# Altium PCB slave.PcbDoc (part 7 of 7)
Units mil, origin at the board's own origin, x right, y up, seen from the top; angles counter-clockwise.
Board outline 6299.21 x 3937.01 mil, 6 copper layers (Top Copper, FUSED_VBAT-, Signal Layer 2, Signal Layer 3, VREG, Bot Copper), stack 65.355 mil thick; 495 components, 307 nets, 1435 pads, 1866 vias.
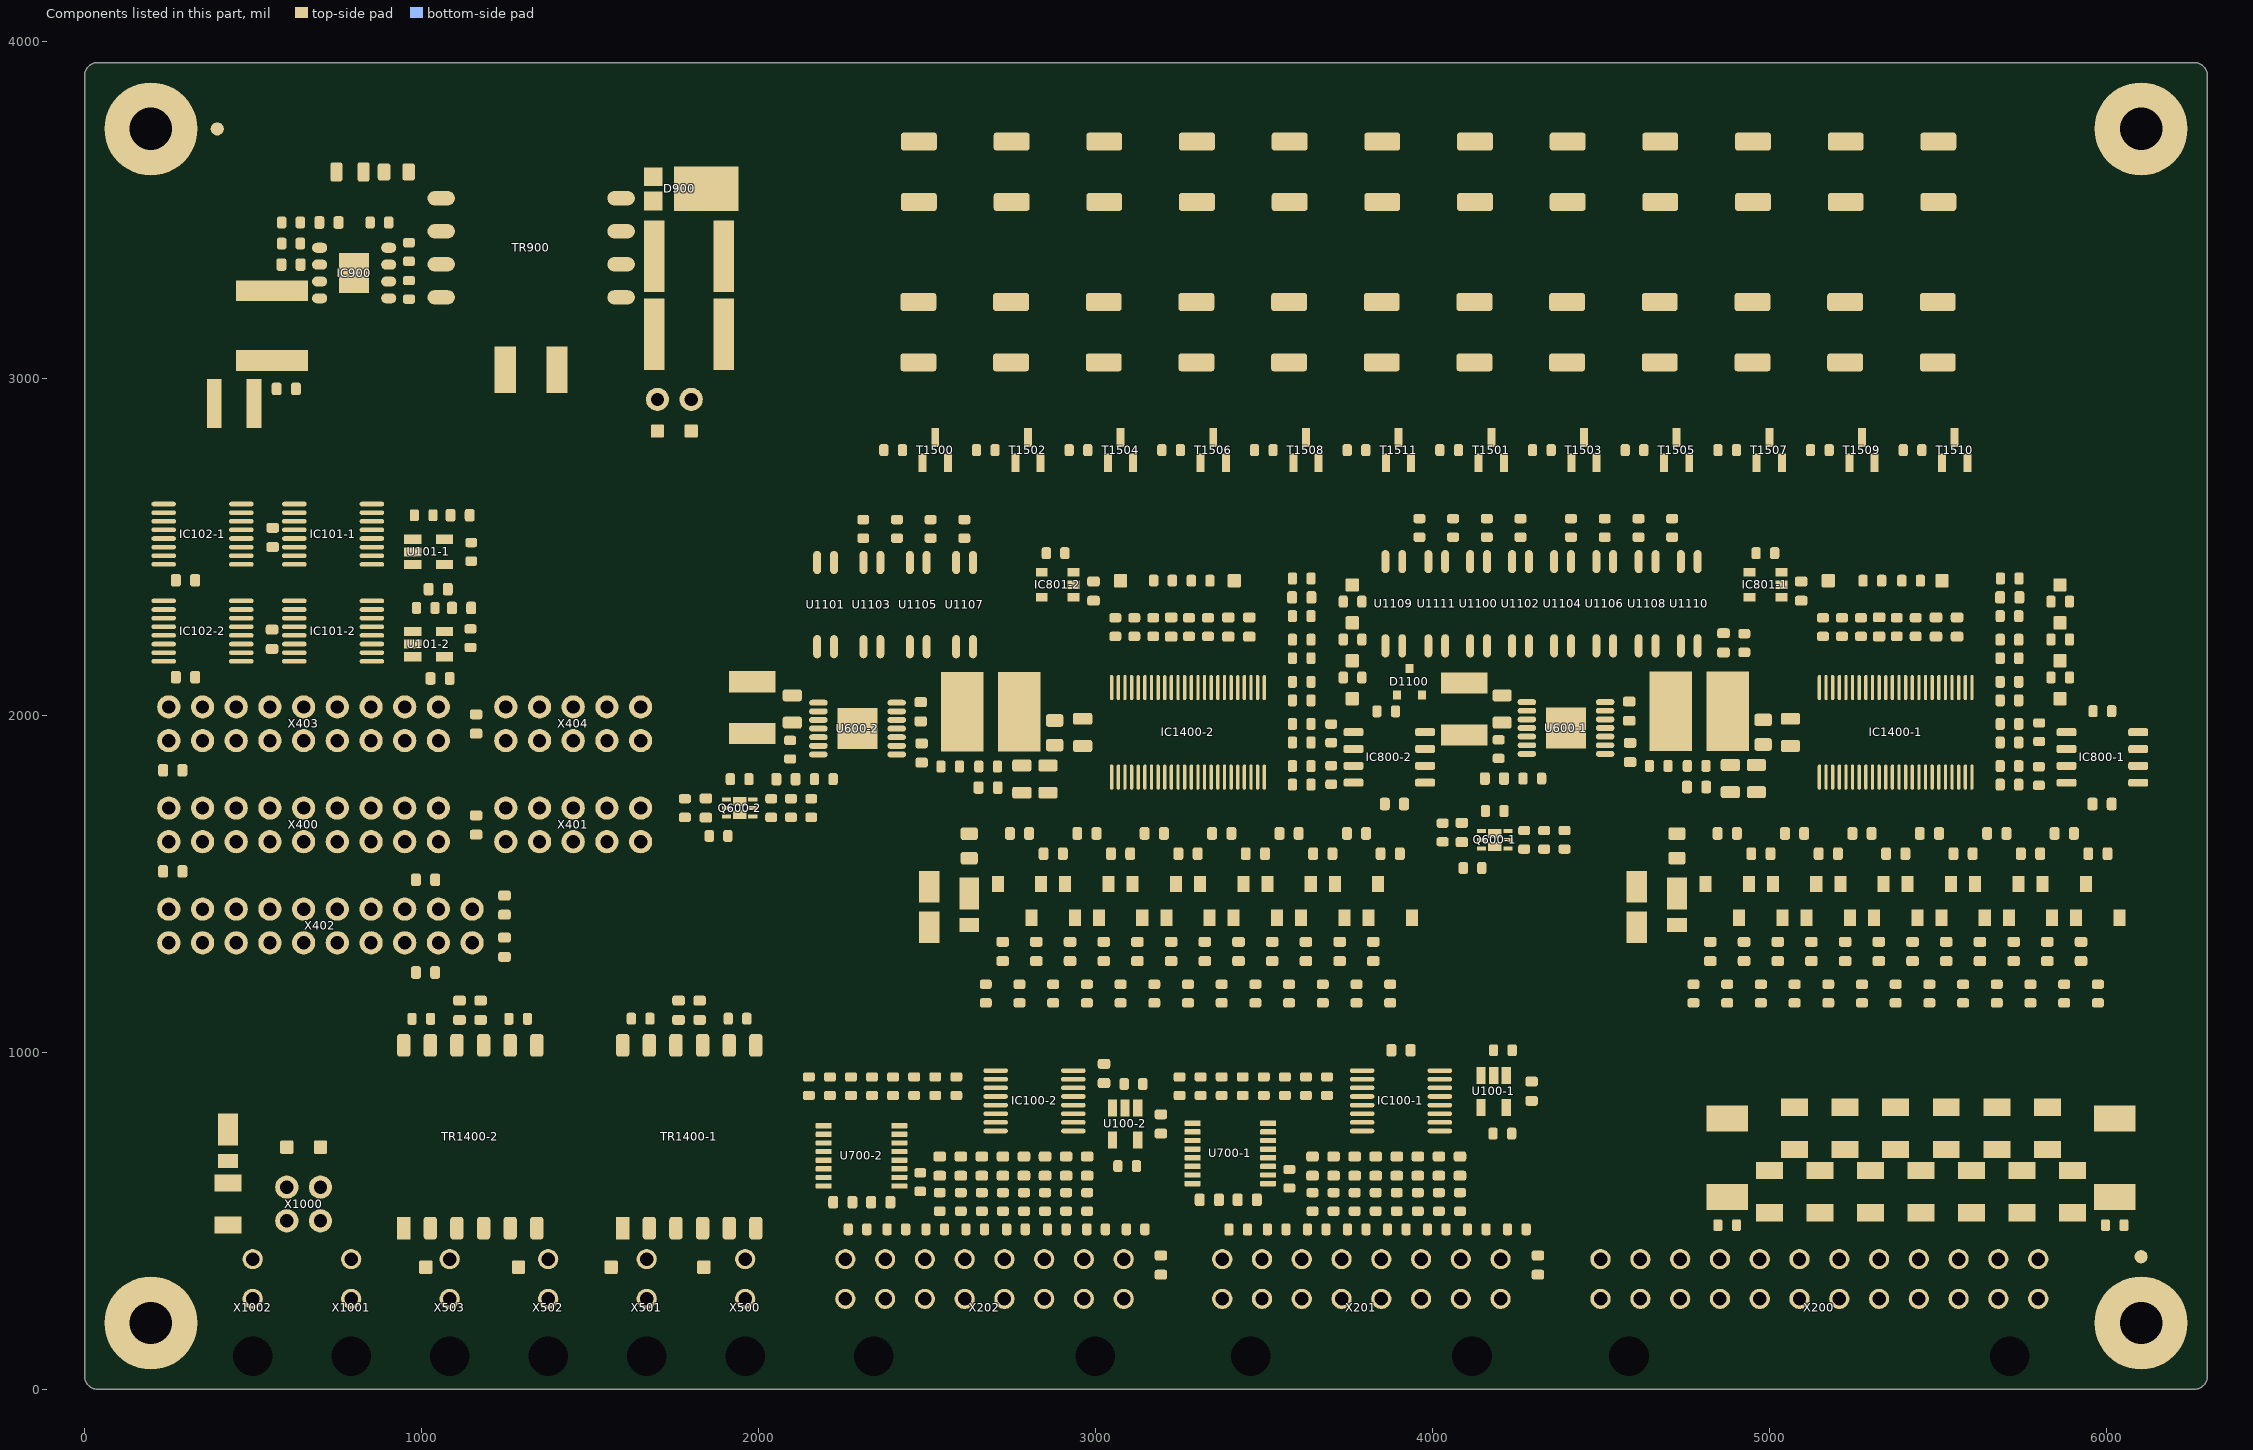
[diagram p10: the components of this part, seen from the top]

## Polygon pours and split planes (outlines as drawn) (continued)
no net on Bottom Overlay "Polygon_13_NoNet" (solid, pour order 20): 31 vertices, not listed, extent 5966.49,1962.62 6145.7,2214.94
no net on Bottom Overlay "Polygon_12_NoNet" (solid, pour order 11): 50 vertices, not listed, extent 5966.41,1985.18 6115.66,2215
no net on Bottom Overlay "Polygon_11_NoNet" (solid, pour order 26): 24 vertices, not listed, extent 5966.46,2051.8 6090.7,2214.92
+5.0V_VREG_0 on VREG "Polygon_1_Net_+5.0V_VREG_0" (solid, remove dead copper, pour order 130): 33 vertices, not listed, extent 196.21,-3 6302.21,2798.28
+5.0V_VREG_1 on VREG "Polygon_1_Net_+5.0V_VREG_1" (solid, remove dead copper, pour order 134): 34 vertices, not listed, extent 183.56,-3 3978,2540.5
VIN_1 on Top Copper "Top-EXT_DC_ISO+" (solid, pour order 394): 1893.65,1998.23 2206.15,1998.23 2206.15,1973.23 2131.15,1973.23 2131.15,1910.73 1893.65,1910.73
FUSED_VBAT- on Top Copper "Top-FUSED_VBAT-" (solid, pour order 388): 18 vertices, not listed, extent 1893.65,1698.23 2893.65,2135.73
FUSED_VBAT- on Top Copper "Top-FUSED_VBAT-" (solid, pour order 368): 18 vertices, not listed, extent 3995.98,1699.97 4995.98,2137.47
EXT_DC_IN- on Top Copper "Polygon_1_Net_EXT_DC_IN-" (solid, remove dead copper, pour order 336): 750,3262.5 750,3487.5 847.5,3487.5 847.5,3112.5 1287.5,3112.5 1287.5,2937.5 606.25,2937.5 606.25,3012.5 443.75,3012.5 443.75,3156.25 675,3156.25 675,3262.5
NetC904_1 on Top Copper "Polygon_1_Net_N$74" (solid, remove dead copper, pour order 332): 587.5,3000 587.5,2843.75 475,2843.75 475,3000
VIN_1 on Top Copper "Top-VIN_2" (solid, pour order 396): 1924.9,1760.7 1949.9,1760.7 1949.9,1839.58 2012.4,1839.58 2012.4,1735.7 1974.9,1735.7 1974.9,1723.2 1924.9,1723.2
VIN_0 on Top Copper "Top-EXT_DC_ISO+" (solid, pour order 366): 3995.98,1999.97 4308.48,1999.97 4308.48,1974.97 4233.48,1974.97 4233.48,1912.47 3995.98,1912.47
+5.0V_VREG_1 on Top Copper "Top-+5.0V_VREG_1" (solid, pour order 400): 2693.65,2135.73 2693.65,1760.73 2731.15,1760.73 2731.15,1885.73 2806.15,1885.73 2806.15,1960.73 2918.65,1960.73 2918.65,2135.73
LTC-V+_0 on Top Copper "Polygon_1_Net_N$17" (solid, remove dead copper, pour order 37): 4430,1622 4800,1622 4800,1692.67 4430,1692.67
+5.0V_VREG_0 on Top Copper "Top-+5.0V_VREG_1" (solid, pour order 360): 4795.98,2137.47 4795.98,1762.47 4833.48,1762.47 4833.48,1887.47 4908.48,1887.47 4908.48,1962.47 5020.98,1962.47 5020.98,2137.47
LTC-V+_1 on Top Copper "Polygon_1_Net_N$24" (solid, remove dead copper, pour order 36): 2231.15,1622 2704.33,1622 2704.33,1687.5 2231.15,1687.5
EXT_DC_ISO+ on Top Copper "Polygon_2_Net_EXT_DC_ISO+" (solid, remove dead copper, pour order 35): 4778,1603 4672,1603 4672,1440.75 4778,1440.75
EXT_DC_ISO+ on Top Copper "Top-EXT_DC_ISO+ 1" (solid, pour order 398): 1750,1773.2 1899.9,1773.2 1899.9,1837.5 1937.4,1837.5 1937.4,1773.2 1924.9,1773.2 1924.9,1735.7 1750,1735.7
SW_1 on Top Copper "Top-SW_2" (solid, pour order 392): 2381.15,2060.73 2531.15,2060.73 2531.15,2135.73 2643.65,2135.73 2643.65,1885.73 2531.15,1885.73 2531.15,2010.73 2443.65,2010.73 2443.65,1973.23 2381.15,1973.23
NetC607-2_2 on Top Copper "Top-NetC1505_2_2" (solid, pour order 390): 2768.65,1873.23 2818.65,1873.23 2818.65,1935.73 2918.65,1935.73 2918.65,1835.73 2768.65,1835.73
NetC607-1_2 on Top Copper "Top-NetC1505_2_2" (solid, pour order 372): 4850,1871.23 4918.75,1871.23 4918.75,1933.73 5018.75,1933.73 5018.75,1833.73 4850,1833.73
SW_0 on Top Copper "Top-SW_2" (solid, pour order 370): 4483.48,2062.47 4633.48,2062.47 4633.48,2137.47 4745.98,2137.47 4745.98,1887.47 4633.48,1887.47 4633.48,2012.47 4545.98,2012.47 4545.98,1974.97 4483.48,1974.97
VIN_0 on Top Copper "Top-VIN_2" (solid, pour order 364): 4162.96,1668.16 4187.36,1668.16 4187.36,1740.66 4246.86,1740.66 4246.86,1643.16 4209.36,1643.16 4209.36,1630.66 4162.96,1630.66
EXT_DC_ISO+ on Top Copper "Top-EXT_DC_ISO+ 1" (solid, pour order 362): 3993.75,1705.7 4134.36,1705.7 4134.36,1740.66 4181.11,1740.66 4181.11,1680.66 4159.36,1680.66 4159.36,1647.59 3993.75,1647.59
no net on Top Copper "Polygon_1_Net_N$92" (solid, remove dead copper, pour order 346): 800,3650 800,3575 912.5,3575 912.5,3650
EXT_DC_IN+ on Top Copper "Polygon_1_Net_EXT_DC_IN+" (solid, remove dead copper, pour order 133): 209.5,653 840.5,653 840.5,209.5 459.5,209.5 459.5,447 209.5,447
NetC902_2 on Top Copper "Polygon_1_Net_N$1254" (solid, remove dead copper, pour order 334): 19 vertices, not listed, extent 350,2843.75 1100,3650
NetC904_1 on Top Copper "Polygon_2_Net_N$91" (solid, remove dead copper, pour order 132): 209.5,722 840.5,722 840.5,865.5 209.5,865.5
NetD901_1 on Top Copper "Polygon_1_Net_N$89" (solid, remove dead copper, pour order 43): 209.5,572 540.5,572 540.5,715.5 209.5,715.5
NetTR900_6 on Top Copper "Polygon_1_Net_N$74" (solid, remove dead copper, pour order 348): 1637.5,3475 1637.5,3300 1537.5,3300 1537.5,3475
NetD900_2 on Top Copper "Polygon_1_Net_N$84" (solid, remove dead copper, pour order 344): 1712.5,3662.5 1712.5,3500 1537.5,3500 1537.5,3662.5
NetIC900_5 on Top Copper "Polygon_1_Net_N$80" (solid, remove dead copper, pour order 342): 1200,3187.5 1200,3650 937.5,3650 937.5,3575 1125,3575 1125,3375 1012.5,3375 1012.5,3262.5 875,3262.5 875,3187.5
EXT_DC_ISO+ on Top Copper "Polygon_1_Net_EXT_DC_ISO+" (solid, pour order 340): 1950,3662.5 1950,2875 1775,2875 1775,3500 1750,3500 1750,3662.5
FUSED_VBAT- on Top Copper "Polygon_2_Net_FUSED_VBAT-" (solid, pour order 338): 1725,3475 1725,2875 1362.5,2875 1362.5,3100 1537.5,3100 1537.5,3275 1662.5,3275 1662.5,3475
EXT_DC_ISO+ on Top Copper "Polygon_4_Net_EXT_DC_ISO+" (solid, remove dead copper, pour order 34): 2678,1603 2572,1603 2572,1440.75 2678,1440.75
FUSED_CELL_10+ on Top Copper "Polygon_1_Net_FUSED_CELL_10+" (solid, remove dead copper, pour order 114): 2346.21,3159.01 2346.21,3590.01 2602.21,3590.01 2602.21,3159.01
FUSED_CELL_9+ on Top Copper "Polygon_1_Net_FUSED_CELL_9+" (solid, remove dead copper, pour order 115): 2621.21,3159.01 2621.21,3590.01 2877.21,3590.01 2877.21,3159.01
FUSED_CELL_8+ on Top Copper "Polygon_1_Net_FUSED_CELL_8+" (solid, remove dead copper, pour order 117): 2896.21,3159.01 2896.21,3590.01 3152.21,3590.01 3152.21,3159.01
FUSED_CELL_7+ on Top Copper "Polygon_1_Net_FUSED_CELL_7+" (solid, remove dead copper, pour order 116): 3171.21,3159.01 3171.21,3590.01 3427.21,3590.01 3427.21,3159.01
FUSED_CELL_6+ on Top Copper "Polygon_1_Net_FUSED_CELL_6+" (solid, remove dead copper, pour order 113): 3446.21,3159.01 3446.21,3590.01 3702.21,3590.01 3702.21,3159.01
FUSED_CELL_5+ on Top Copper "Polygon_1_Net_FUSED_CELL_5+" (solid, remove dead copper, pour order 108): 3721.21,3159.01 3721.21,3590.01 3977.21,3590.01 3977.21,3159.01
FUSED_CELL_4+ on Top Copper "Polygon_1_Net_FUSED_CELL_4+" (solid, remove dead copper, pour order 107): 3996.21,3159.01 3996.21,3590.01 4252.21,3590.01 4252.21,3159.01
FUSED_CELL_3+ on Top Copper "Polygon_1_Net_FUSED_CELL_3+" (solid, remove dead copper, pour order 106): 4271.21,3159.01 4271.21,3590.01 4527.21,3590.01 4527.21,3159.01
FUSED_CELL_2+ on Top Copper "Polygon_1_Net_FUSED_CELL_2+" (solid, remove dead copper, pour order 109): 4546.21,3159.01 4546.21,3590.01 4802.21,3590.01 4802.21,3159.01
FUSED_CELL_1+ on Top Copper "Polygon_1_Net_FUSED_CELL_1+" (solid, remove dead copper, pour order 112): 4821.21,3159.01 4821.21,3590.01 5077.21,3590.01 5077.21,3159.01
FUSED_CELL_0+ on Top Copper "Polygon_1_Net_FUSED_CELL_0+" (solid, remove dead copper, pour order 111): 5096.21,3159.01 5096.21,3590.01 5352.21,3590.01 5352.21,3159.01
FUSED_CELL_0- on Top Copper "Polygon_1_Net_FUSED_CELL_0-" (solid, remove dead copper, pour order 110): 5627.21,3590.01 5627.21,3159.01 5371.21,3159.01 5371.21,3590.01
CELL0_FEEDBACK+ on Top Copper "Polygon_3_Net_CELL0_FEEDBACK+" (solid, remove dead copper, pour order 82): 5627.21,3634.01 5371.21,3634.01 5371.21,3915.01 5627.21,3915.01
CELL0_FEEDBACK+ on Top Copper "Polygon_1_Net_CELL0_FEEDBACK+" (solid, remove dead copper, pour order 83): 5627.21,2834.01 5371.21,2834.01 5371.21,3115.01 5627.21,3115.01
CELL11_FEEDBACK+ on Top Copper "Polygon_3_Net_CELL11_FEEDBACK+" (solid, remove dead copper, pour order 84): 2346.21,3634.01 2346.21,3915.01 2602.21,3915.01 2602.21,3634.01
CELL11_FEEDBACK+ on Top Copper "Polygon_1_Net_CELL11_FEEDBACK+" (solid, remove dead copper, pour order 79): 2346.21,2834.01 2346.21,3115.01 2602.21,3115.01 2602.21,2834.01
CELL10_FEEDBACK+ on Top Copper "Polygon_3_Net_CELL10_FEEDBACK+" (solid, remove dead copper, pour order 80): 2621.21,3634.01 2621.21,3915.01 2877.21,3915.01 2877.21,3634.01
CELL10_FEEDBACK+ on Top Copper "Polygon_1_Net_CELL10_FEEDBACK+" (solid, remove dead copper, pour order 81): 2621.21,2834.01 2621.21,3115.01 2877.21,3115.01 2877.21,2834.01
CELL8_FEEDBACK+ on Top Copper "Polygon_3_Net_CELL8_FEEDBACK+" (solid, remove dead copper, pour order 85): 3171.21,3634.01 3171.21,3915.01 3427.21,3915.01 3427.21,3634.01
CELL8_FEEDBACK+ on Top Copper "Polygon_1_Net_CELL8_FEEDBACK+" (solid, remove dead copper, pour order 89): 3171.21,2834.01 3171.21,3115.01 3427.21,3115.01 3427.21,2834.01
CELL9_FEEDBACK+ on Top Copper "Polygon_3_Net_CELL9_FEEDBACK+" (solid, remove dead copper, pour order 90): 2896.21,3634.01 2896.21,3915.01 3152.21,3915.01 3152.21,3634.01
CELL9_FEEDBACK+ on Top Copper "Polygon_1_Net_CELL9_FEEDBACK+" (solid, remove dead copper, pour order 91): 2896.21,2834.01 2896.21,3115.01 3152.21,3115.01 3152.21,2834.01
CELL2_FEEDBACK+ on Top Copper "Polygon_3_Net_CELL2_FEEDBACK+" (solid, remove dead copper, pour order 86): 4821.21,3634.01 4821.21,3915.01 5077.21,3915.01 5077.21,3634.01
CELL2_FEEDBACK+ on Top Copper "Polygon_1_Net_CELL2_FEEDBACK+" (solid, remove dead copper, pour order 87): 4821.21,2834.01 4821.21,3115.01 5077.21,3115.01 5077.21,2834.01
CELL3_FEEDBACK+ on Top Copper "Polygon_3_Net_CELL3_FEEDBACK+" (solid, remove dead copper, pour order 88): 4546.21,3634.01 4546.21,3915.01 4802.21,3915.01 4802.21,3634.01
CELL3_FEEDBACK+ on Top Copper "Polygon_1_Net_CELL3_FEEDBACK+" (solid, remove dead copper, pour order 54): 4546.21,2834.01 4546.21,3115.01 4802.21,3115.01 4802.21,2834.01
CELL4_FEEDBACK+ on Top Copper "Polygon_3_Net_CELL4_FEEDBACK+" (solid, remove dead copper, pour order 55): 4271.21,3634.01 4271.21,3915.01 4527.21,3915.01 4527.21,3634.01
CELL4_FEEDBACK+ on Top Copper "Polygon_1_Net_CELL4_FEEDBACK+" (solid, remove dead copper, pour order 52): 4271.21,2834.01 4271.21,3115.01 4527.21,3115.01 4527.21,2834.01
CELL5_FEEDBACK+ on Top Copper "Polygon_3_Net_CELL5_FEEDBACK+" (solid, remove dead copper, pour order 53): 3996.21,3634.01 3996.21,3915.01 4252.21,3915.01 4252.21,3634.01
CELL5_FEEDBACK+ on Top Copper "Polygon_1_Net_CELL5_FEEDBACK+" (solid, remove dead copper, pour order 56): 3996.21,2834.01 3996.21,3115.01 4252.21,3115.01 4252.21,2834.01
CELL1_FEEDBACK+ on Top Copper "Polygon_3_Net_CELL1_FEEDBACK+" (solid, remove dead copper, pour order 59): 5096.21,3634.01 5096.21,3915.01 5352.21,3915.01 5352.21,3634.01
CELL1_FEEDBACK+ on Top Copper "Polygon_1_Net_CELL1_FEEDBACK+" (solid, remove dead copper, pour order 60): 5096.21,2834.01 5096.21,3115.01 5352.21,3115.01 5352.21,2834.01
CELL7_FEEDBACK+ on Top Copper "Polygon_3_Net_CELL7_FEEDBACK+" (solid, remove dead copper, pour order 57): 3446.21,3634.01 3446.21,3915.01 3702.21,3915.01 3702.21,3634.01
CELL7_FEEDBACK+ on Top Copper "Polygon_1_Net_CELL7_FEEDBACK+" (solid, remove dead copper, pour order 58): 3446.21,2834.01 3446.21,3115.01 3702.21,3115.01 3702.21,2834.01
CELL6_FEEDBACK+ on Top Copper "Polygon_3_Net_CELL6_FEEDBACK+" (solid, remove dead copper, pour order 45): 3721.21,3634.01 3721.21,3915.01 3977.21,3915.01 3977.21,3634.01
CELL6_FEEDBACK+ on Top Copper "Polygon_1_Net_CELL6_FEEDBACK+" (solid, remove dead copper, pour order 46): 3721.21,2834.01 3721.21,3115.01 3977.21,3115.01 3977.21,2834.01
EXT_DC_IN- on Bot Copper "Polygon_3_Net_EXT_DC_IN-" (solid, remove dead copper, pour order 124): 840.5,209.5 459.5,209.5 459.5,653 840.5,653
EXT_DC_IN- on Bot Copper "Polygon_2_Net_EXT_DC_IN-" (solid, pour order 350): 1200,2937.5 1200,3650 725,3650 350,3650 350,3412.5 350,2937.5
NetTR900_6 on Bot Copper "Polygon_2_Net_N$74" (solid, pour order 358): 1637.5,3475 1637.5,3300 1537.5,3300 1537.5,3475
NetD900_2 on Bot Copper "Polygon_2_Net_N$84" (solid, pour order 356): 1725,3662.5 1725,3487.5 1537.5,3487.5 1537.5,3662.5
FUSED_VBAT- on Bot Copper "Polygon_3_Net_FUSED_VBAT-" (solid, pour order 354): 1725,3475 1725,2875 1362.5,2875 1362.5,3100 1537.5,3100 1537.5,3275 1654.18,3275 1654.18,3475
EXT_DC_ISO+ on Bot Copper "Polygon_6_Net_EXT_DC_ISO+" (solid, remove dead copper, pour order 352): 1950,3662.5 1950,2875 1775,2875 1775,3487.5 1737.5,3487.5 1737.5,3662.5
CELL11_FEEDBACK+ on Bot Copper "Polygon_1_Net_CELL11_FEEDBACK+1" (solid, pour order 47): 2346.21,3634.01 2346.21,3915.01 2602.21,3915.01 2602.21,3634.01
FUSED_CELL_2+ on Bot Copper "Polygon_1_Net_N$19" (solid, pour order 105): 4546.21,3159.01 4546.21,3590.01 4802.21,3590.01 4802.21,3159.01
FUSED_CELL_3+ on Bot Copper "Polygon_1_Net_N$23" (solid, pour order 104): 4271.21,3159.01 4271.21,3590.01 4527.21,3590.01 4527.21,3159.01
FUSED_CELL_4+ on Bot Copper "Polygon_1_Net_N$21" (solid, pour order 103): 3996.21,3159.01 3996.21,3590.01 4252.21,3590.01 4252.21,3159.01
FUSED_CELL_0- on Bot Copper "Polygon_1_Net_N$4" (solid, pour order 102): 5627.21,3590.01 5627.21,3159.01 5371.21,3159.01 5371.21,3590.01
FUSED_CELL_0+ on Bot Copper "Polygon_1_Net_N$11" (solid, pour order 101): 5096.21,3159.01 5096.21,3590.01 5352.21,3590.01 5352.21,3159.01
FUSED_CELL_1+ on Bot Copper "Polygon_1_Net_N$13" (solid, pour order 100): 4821.21,3159.01 4821.21,3590.01 5077.21,3590.01 5077.21,3159.01
FUSED_CELL_10+ on Bot Copper "Polygon_1_Net_N$27" (solid, pour order 99): 2346.21,3159.01 2346.21,3590.01 2602.21,3590.01 2602.21,3159.01
FUSED_CELL_6+ on Bot Copper "Polygon_1_Net_N$46" (solid, pour order 98): 3446.21,3159.01 3446.21,3590.01 3702.21,3590.01 3702.21,3159.01
FUSED_CELL_5+ on Bot Copper "Polygon_1_Net_N$48" (solid, pour order 97): 3721.21,3159.01 3721.21,3590.01 3977.21,3590.01 3977.21,3159.01
FUSED_CELL_7+ on Bot Copper "Polygon_1_Net_N$43" (solid, pour order 96): 3171.21,3159.01 3171.21,3590.01 3427.21,3590.01 3427.21,3159.01
FUSED_CELL_9+ on Bot Copper "Polygon_1_Net_N$29" (solid, pour order 95): 2621.21,3159.01 2621.21,3590.01 2877.21,3590.01 2877.21,3159.01
FUSED_CELL_8+ on Bot Copper "Polygon_1_Net_N$41" (solid, pour order 94): 2896.21,3159.01 2896.21,3590.01 3152.21,3590.01 3152.21,3159.01
CELL6_FEEDBACK+ on Bot Copper "Polygon_1_Net_CELL6_FEEDBACK+1" (solid, pour order 77): 3721.21,3634.01 3721.21,3915.01 3977.21,3915.01 3977.21,3634.01
CELL5_FEEDBACK+ on Bot Copper "Polygon_1_Net_CELL5_FEEDBACK+1" (solid, pour order 74): 3996.21,3634.01 3996.21,3915.01 4252.21,3915.01 4252.21,3634.01
CELL4_FEEDBACK+ on Bot Copper "Polygon_1_Net_CELL4_FEEDBACK+1" (solid, pour order 73): 4271.21,3634.01 4271.21,3915.01 4527.21,3915.01 4527.21,3634.01
CELL7_FEEDBACK+ on Bot Copper "Polygon_1_Net_CELL7_FEEDBACK+1" (solid, pour order 72): 3446.21,3634.01 3446.21,3915.01 3702.21,3915.01 3702.21,3634.01
CELL1_FEEDBACK+ on Bot Copper "Polygon_1_Net_CELL1_FEEDBACK+1" (solid, pour order 71): 5096.21,3634.01 5096.21,3915.01 5352.21,3915.01 5352.21,3634.01
CELL3_FEEDBACK+ on Bot Copper "Polygon_1_Net_CELL3_FEEDBACK+1" (solid, pour order 61): 4546.21,3634.01 4546.21,3915.01 4802.21,3915.01 4802.21,3634.01
CELL8_FEEDBACK+ on Bot Copper "Polygon_1_Net_CELL8_FEEDBACK+1" (solid, pour order 51): 3171.21,3634.01 3171.21,3915.01 3427.21,3915.01 3427.21,3634.01
CELL10_FEEDBACK+ on Bot Copper "Polygon_1_Net_CELL10_FEEDBACK+1" (solid, pour order 50): 2621.21,3634.01 2621.21,3915.01 2877.21,3915.01 2877.21,3634.01
CELL2_FEEDBACK+ on Bot Copper "Polygon_1_Net_CELL2_FEEDBACK+1" (solid, pour order 49): 4821.21,3634.01 4821.21,3915.01 5077.21,3915.01 5077.21,3634.01
CELL9_FEEDBACK+ on Bot Copper "Polygon_1_Net_CELL9_FEEDBACK+1" (solid, pour order 48): 2896.21,3634.01 2896.21,3915.01 3152.21,3915.01 3152.21,3634.01
CELL0_FEEDBACK+ on Bot Copper "Polygon_1_Net_CELL0_FEEDBACK+1" (solid, pour order 44): 5627.21,3634.01 5371.21,3634.01 5371.21,3915.01 5627.21,3915.01
CELL0_FEEDBACK+ on Bot Copper "Polygon_2_Net_CELL0_FEEDBACK+" (solid, pour order 75): 5627.21,2834.01 5371.21,2834.01 5371.21,3115.01 5627.21,3115.01
CELL11_FEEDBACK+ on Bot Copper "Polygon_2_Net_CELL11_FEEDBACK+" (solid, pour order 76): 2346.21,2834.01 2346.21,3115.01 2602.21,3115.01 2602.21,2834.01
CELL10_FEEDBACK+ on Bot Copper "Polygon_2_Net_CELL10_FEEDBACK+" (solid, pour order 70): 2621.21,2834.01 2621.21,3115.01 2877.21,3115.01 2877.21,2834.01
CELL8_FEEDBACK+ on Bot Copper "Polygon_2_Net_CELL8_FEEDBACK+" (solid, pour order 62): 3171.21,2834.01 3171.21,3115.01 3427.21,3115.01 3427.21,2834.01
CELL9_FEEDBACK+ on Bot Copper "Polygon_2_Net_CELL9_FEEDBACK+" (solid, pour order 63): 2896.21,2834.01 2896.21,3115.01 3152.21,3115.01 3152.21,2834.01
CELL2_FEEDBACK+ on Bot Copper "Polygon_2_Net_CELL2_FEEDBACK+" (solid, pour order 68): 4821.21,2834.01 4821.21,3115.01 5077.21,3115.01 5077.21,2834.01
CELL3_FEEDBACK+ on Bot Copper "Polygon_2_Net_CELL3_FEEDBACK+" (solid, pour order 66): 4546.21,2834.01 4546.21,3115.01 4802.21,3115.01 4802.21,2834.01
CELL4_FEEDBACK+ on Bot Copper "Polygon_2_Net_CELL4_FEEDBACK+" (solid, pour order 67): 4271.21,2834.01 4271.21,3115.01 4527.21,3115.01 4527.21,2834.01
CELL5_FEEDBACK+ on Bot Copper "Polygon_2_Net_CELL5_FEEDBACK+" (solid, pour order 69): 3996.21,2834.01 3996.21,3115.01 4252.21,3115.01 4252.21,2834.01
CELL1_FEEDBACK+ on Bot Copper "Polygon_2_Net_CELL1_FEEDBACK+" (solid, pour order 65): 5096.21,2834.01 5096.21,3115.01 5352.21,3115.01 5352.21,2834.01
CELL7_FEEDBACK+ on Bot Copper "Polygon_2_Net_CELL7_FEEDBACK+" (solid, pour order 64): 3446.21,2834.01 3446.21,3115.01 3702.21,3115.01 3702.21,2834.01
CELL6_FEEDBACK+ on Bot Copper "Polygon_2_Net_CELL6_FEEDBACK+" (solid, pour order 78): 3721.21,2834.01 3721.21,3115.01 3977.21,3115.01 3977.21,2834.01
FUSED_CELL_10+ on Signal Layer 2 "FUSED_CELL_10+_L03_P182" (solid, pour order 182): 2346,3531.24 2347,3530.24 2601,3530.24 2601,3406.27 2600.03,3407.24 2346,3407.24
FUSED_CELL_9+ on Signal Layer 2 "FUSED_CELL_9+_L03_P180" (solid, pour order 180): 2622,3531.24 2623,3530.24 2877,3530.24 2877,3406.27 2876.03,3407.24 2622,3407.24
FUSED_CELL_8+ on Signal Layer 2 "FUSED_CELL_8+_L03_P178" (solid, pour order 178): 2898,3531.24 2899,3530.24 3153,3530.24 3153,3406.27 3152.03,3407.24 2898,3407.24
FUSED_CELL_7+ on Signal Layer 2 "FUSED_CELL_7+_L03_P176" (solid, pour order 176): 3171,3531.24 3172,3530.24 3426,3530.24 3426,3406.27 3425.03,3407.24 3171,3407.24
FUSED_CELL_6+ on Signal Layer 2 "FUSED_CELL_6+_L03_P174" (solid, pour order 174): 3446,3531.24 3447,3530.24 3701,3530.24 3701,3406.27 3700.03,3407.24 3446,3407.24
FUSED_CELL_5+ on Signal Layer 2 "FUSED_CELL_5+_L03_P172" (solid, pour order 172): 3720,3531.24 3721,3530.24 3975,3530.24 3975,3406.27 3974.03,3407.24 3720,3407.24
FUSED_CELL_4+ on Signal Layer 2 "FUSED_CELL_4+_L03_P170" (solid, pour order 170): 3995,3531.24 3996,3530.24 4250,3530.24 4250,3406.27 4249.03,3407.24 3995,3407.24
FUSED_CELL_3+ on Signal Layer 2 "FUSED_CELL_3+_L03_P168" (solid, pour order 168): 4271,3531.24 4272,3530.24 4526,3530.24 4526,3406.27 4525.03,3407.24 4271,3407.24
FUSED_CELL_2+ on Signal Layer 2 "FUSED_CELL_2+_L03_P166" (solid, pour order 166): 4546,3531.24 4547,3530.24 4801,3530.24 4801,3406.27 4800.03,3407.24 4546,3407.24
FUSED_CELL_1+ on Signal Layer 2 "FUSED_CELL_1+_L03_P164" (solid, pour order 164): 4822,3531.24 4823,3530.24 5077,3530.24 5077,3406.27 5076.03,3407.24 4822,3407.24
FUSED_CELL_0+ on Signal Layer 2 "FUSED_CELL_0+_L03_P162" (solid, pour order 162): 5097,3531.24 5098,3530.24 5352,3530.24 5352,3406.27 5351.03,3407.24 5097,3407.24
FUSED_CELL_0- on Signal Layer 2 "FUSED_CELL_0-_L03_P160" (solid, pour order 160): 5370,3531.24 5371,3530.24 5625,3530.24 5625,3406.27 5624.03,3407.24 5370,3407.24
FUSED_CELL_0- on Signal Layer 2 "FUSED_CELL_0-_L03_P158" (solid, pour order 158): 5371,3334 5372,3333 5626,3333 5626,3209.03 5625.03,3210 5371,3210
FUSED_CELL_0+ on Signal Layer 2 "FUSED_CELL_0+_L03_P156" (solid, pour order 156): 5098,3334 5099,3333 5353,3333 5353,3209.03 5352.03,3210 5098,3210
FUSED_CELL_1+ on Signal Layer 2 "FUSED_CELL_1+_L03_P154" (solid, pour order 154): 4823,3334 4824,3333 5078,3333 5078,3209.03 5077.03,3210 4823,3210
FUSED_CELL_2+ on Signal Layer 2 "FUSED_CELL_2+_L03_P152" (solid, pour order 152): 4547,3334 4548,3333 4802,3333 4802,3209.03 4801.03,3210 4547,3210
FUSED_CELL_3+ on Signal Layer 2 "FUSED_CELL_3+_L03_P150" (solid, pour order 150): 4272,3334 4273,3333 4527,3333 4527,3209.03 4526.03,3210 4272,3210
FUSED_CELL_4+ on Signal Layer 2 "FUSED_CELL_4+_L03_P148" (solid, pour order 148): 3996,3334 3997,3333 4251,3333 4251,3209.03 4250.03,3210 3996,3210
FUSED_CELL_5+ on Signal Layer 2 "FUSED_CELL_5+_L03_P146" (solid, pour order 146): 3721,3334 3722,3333 3976,3333 3976,3209.03 3975.03,3210 3721,3210
FUSED_CELL_6+ on Signal Layer 2 "FUSED_CELL_6+_L03_P144" (solid, pour order 144): 3447,3334 3448,3333 3702,3333 3702,3209.03 3701.03,3210 3447,3210
FUSED_CELL_7+ on Signal Layer 2 "FUSED_CELL_7+_L03_P142" (solid, pour order 142): 3172,3334 3173,3333 3427,3333 3427,3209.03 3426.03,3210 3172,3210
FUSED_CELL_8+ on Signal Layer 2 "FUSED_CELL_8+_L03_P140" (solid, pour order 140): 2899,3334 2900,3333 3154,3333 3154,3209.03 3153.03,3210 2899,3210
FUSED_CELL_9+ on Signal Layer 2 "FUSED_CELL_9+_L03_P138" (solid, pour order 138): 2623,3334 2624,3333 2878,3333 2878,3209.03 2877.03,3210 2623,3210
FUSED_CELL_10+ on Signal Layer 2 "FUSED_CELL_10+_L03_P136" (solid, pour order 136): 2347,3334 2348,3333 2602,3333 2602,3209.03 2601.03,3210 2347,3210
CELL10_FEEDBACK+ on Signal Layer 3 "CELL10_FEEDBACK+_L04_P302" (solid, remove dead copper, pour order 302): 2622,3161 2623,3160 2877,3160 2877,2834.35 2622,2834.35
CELL4_FEEDBACK+ on Signal Layer 3 "CELL4_FEEDBACK+_L04_P290" (solid, remove dead copper, pour order 290): 4271,3161 4272,3160 4526,3160 4526,2834.35 4271,2834.35
CELL3_FEEDBACK+ on Signal Layer 3 "CELL3_FEEDBACK+_L04_P288" (solid, remove dead copper, pour order 288): 4546,3161 4547,3160 4801,3160 4801,2834.35 4546,2834.35
CELL2_FEEDBACK+ on Signal Layer 3 "CELL2_FEEDBACK+_L04_P286" (solid, remove dead copper, pour order 286): 4822,3161 4823,3160 5077,3160 5077,2834.35 4822,2834.35
CELL1_FEEDBACK+ on Signal Layer 3 "CELL1_FEEDBACK+_L04_P284" (solid, remove dead copper, pour order 284): 5097,3161 5098,3160 5352,3160 5352,2834.35 5097,2834.35
CELL0_FEEDBACK+ on Signal Layer 3 "CELL0_FEEDBACK+_L04_P282" (solid, remove dead copper, pour order 282): 5370,3161 5371,3160 5625,3160 5625,2834.35 5370,2834.35
CELL5_FEEDBACK+ on Signal Layer 3 "CELL5_FEEDBACK+_L04_P292" (solid, remove dead copper, pour order 292): 3995,3161 3996,3160 4250,3160 4250,2834.35 3995,2834.35
CELL6_FEEDBACK+ on Signal Layer 3 "CELL6_FEEDBACK+_L04_P294" (solid, remove dead copper, pour order 294): 3720,3161 3721,3160 3975,3160 3975,2834.35 3720,2834.35
CELL7_FEEDBACK+ on Signal Layer 3 "CELL7_FEEDBACK+_L04_P296" (solid, remove dead copper, pour order 296): 3446,3161 3447,3160 3701,3160 3701,2834.35 3446,2834.35
CELL8_FEEDBACK+ on Signal Layer 3 "CELL8_FEEDBACK+_L04_P298" (solid, remove dead copper, pour order 298): 3171,3161 3172,3160 3426,3160 3426,2834.35 3171,2834.35
CELL9_FEEDBACK+ on Signal Layer 3 "CELL9_FEEDBACK+_L04_P300" (solid, remove dead copper, pour order 300): 2898,3161 2899,3160 3153,3160 3153,2834.35 2898,2834.35
CELL10_FEEDBACK+ on Signal Layer 3 "CELL10_FEEDBACK+_L04_P326" (solid, remove dead copper, pour order 326): 2622,3916 2623,3915 2877,3915 2877,3589.35 2622,3589.35
CELL9_FEEDBACK+ on Signal Layer 3 "CELL9_FEEDBACK+_L04_P324" (solid, remove dead copper, pour order 324): 2898,3916 2899,3915 3153,3915 3153,3589.35 2898,3589.35
CELL8_FEEDBACK+ on Signal Layer 3 "CELL8_FEEDBACK+_L04_P322" (solid, remove dead copper, pour order 322): 3171,3916 3172,3915 3426,3915 3426,3589.35 3171,3589.35
CELL7_FEEDBACK+ on Signal Layer 3 "CELL7_FEEDBACK+_L04_P320" (solid, remove dead copper, pour order 320): 3446,3916 3447,3915 3701,3915 3701,3589.35 3446,3589.35
CELL6_FEEDBACK+ on Signal Layer 3 "CELL6_FEEDBACK+_L04_P318" (solid, remove dead copper, pour order 318): 3720,3916 3721,3915 3975,3915 3975,3589.35 3720,3589.35
CELL5_FEEDBACK+ on Signal Layer 3 "CELL5_FEEDBACK+_L04_P316" (solid, remove dead copper, pour order 316): 3995,3916 3996,3915 4250,3915 4250,3589.35 3995,3589.35
CELL4_FEEDBACK+ on Signal Layer 3 "CELL4_FEEDBACK+_L04_P314" (solid, remove dead copper, pour order 314): 4271,3916 4272,3915 4526,3915 4526,3589.35 4271,3589.35
CELL3_FEEDBACK+ on Signal Layer 3 "CELL3_FEEDBACK+_L04_P312" (solid, remove dead copper, pour order 312): 4546,3916 4547,3915 4801,3915 4801,3589.35 4546,3589.35
CELL2_FEEDBACK+ on Signal Layer 3 "CELL2_FEEDBACK+_L04_P310" (solid, remove dead copper, pour order 310): 4822,3916 4823,3915 5077,3915 5077,3589.35 4822,3589.35
CELL1_FEEDBACK+ on Signal Layer 3 "CELL1_FEEDBACK+_L04_P308" (solid, remove dead copper, pour order 308): 5097,3916 5098,3915 5352,3915 5352,3589.35 5097,3589.35
CELL0_FEEDBACK+ on Signal Layer 3 "CELL0_FEEDBACK+_L04_P306" (solid, remove dead copper, pour order 306): 5370,3916 5371,3915 5625,3915 5625,3589.35 5370,3589.35
CELL11_FEEDBACK+ on Signal Layer 3 "CELL11_FEEDBACK+_L04_P304" (solid, remove dead copper, pour order 304): 2346,3916 2347,3915 2601,3915 2601,3589.35 2346,3589.35
CELL11_FEEDBACK+ on Signal Layer 3 "CELL11_FEEDBACK+_L04_P280" (solid, remove dead copper, pour order 280): 2346,3161 2347,3160 2601,3160 2601,2834.35 2346,2834.35
FUSED_CELL_10+ on Signal Layer 3 "FUSED_CELL_10+_L04_P232" (solid, remove dead copper, pour order 232): 2347,3531.65 2348,3530.65 2602,3530.65 2602,3205 2347,3205
FUSED_CELL_0- on Signal Layer 3 "FUSED_CELL_0-_L04_P254" (solid, remove dead copper, pour order 254): 5371,3531.65 5372,3530.65 5626,3530.65 5626,3205 5371,3205
FUSED_CELL_0+ on Signal Layer 3 "FUSED_CELL_0+_L04_P252" (solid, remove dead copper, pour order 252): 5098,3531.65 5099,3530.65 5353,3530.65 5353,3205 5098,3205
FUSED_CELL_1+ on Signal Layer 3 "FUSED_CELL_1+_L04_P250" (solid, remove dead copper, pour order 250): 4823,3531.65 4824,3530.65 5078,3530.65 5078,3205 4823,3205
FUSED_CELL_2+ on Signal Layer 3 "FUSED_CELL_2+_L04_P248" (solid, remove dead copper, pour order 248): 4547,3531.65 4548,3530.65 4802,3530.65 4802,3205 4547,3205
FUSED_CELL_3+ on Signal Layer 3 "FUSED_CELL_3+_L04_P246" (solid, remove dead copper, pour order 246): 4272,3531.65 4273,3530.65 4527,3530.65 4527,3205 4272,3205
FUSED_CELL_4+ on Signal Layer 3 "FUSED_CELL_4+_L04_P244" (solid, remove dead copper, pour order 244): 3996,3531.65 3997,3530.65 4251,3530.65 4251,3205 3996,3205
FUSED_CELL_5+ on Signal Layer 3 "FUSED_CELL_5+_L04_P242" (solid, remove dead copper, pour order 242): 3721,3531.65 3722,3530.65 3976,3530.65 3976,3205 3721,3205
FUSED_CELL_6+ on Signal Layer 3 "FUSED_CELL_6+_L04_P240" (solid, remove dead copper, pour order 240): 3447,3531.65 3448,3530.65 3702,3530.65 3702,3205 3447,3205
FUSED_CELL_7+ on Signal Layer 3 "FUSED_CELL_7+_L04_P238" (solid, remove dead copper, pour order 238): 3172,3531.65 3173,3530.65 3427,3530.65 3427,3205 3172,3205
FUSED_CELL_8+ on Signal Layer 3 "FUSED_CELL_8+_L04_P236" (solid, remove dead copper, pour order 236): 2899,3531.65 2900,3530.65 3154,3530.65 3154,3205 2899,3205
FUSED_CELL_9+ on Signal Layer 3 "FUSED_CELL_9+_L04_P234" (solid, remove dead copper, pour order 234): 2623,3531.65 2624,3530.65 2878,3530.65 2878,3205 2623,3205
FUSED_VBAT- on FUSED_VBAT- "Polygon_1_Net_FUSED_VBAT-" (solid, remove dead copper, pour order 131): 6302.21,3940.01 1593.76,3940.5 ccw(c1593.65,3887.6) 1540.75,3887.49 1540.75,2850 cw(c1493.75,2850) 1493.75,2803 1056.72,2802.51 250,2803 ccw(c250,2750) 197,2750 197,1037.5 ccw(c250,1037.5) 250,984.5 2049.9,984.5 cw(c2057.87,932.75) 2109,944 2109,39.37 ccw(c2151.92,39.92) 2151.37,-3 6302.21,-3

## Keep-outs
Keep-Out Layer:
  circle w3.94: c6102.36,3740.16 r157.48
  region: 185,3555 185,380 0,380 0,3555
  region: 6299.21,3555 6299.21,360 6130,360 6130,3555
  region: 5930,3937.01 5930,3740.16 443.75,3740.16 443.75,3937.01
  lines w6: 0,39.37 ccw(c39.37,39.37) 39.37,0 6259.84,0 ccw(c6259.84,39.37) 6299.21,39.37 6299.21,3897.64 ccw(c6259.84,3897.64) 6259.84,3937.01 39.37,3937.01 ccw(c39.37,3897.64) 0,3897.64 0,39.37

## Other copper
Top Copper:
FUSED_VBAT-:
  pour cut-out: 2345,3335 5630,3335 5630,3210 2345,3210
  pour cut-out: 2345,3540 5630,3540 5630,3415 2345,3415
  pour cut-out: 2346.21,3060 5627.21,3060 5627.21,2890 2346.21,2890
  pour cut-out: 2346.21,3855 5627.21,3855 5627.21,3685 2346.21,3685

## Silkscreen, mask and mechanical layers (free items; w line width, h text height)
Top Overlay:
  drawing of 96 lines, arcs and shapes, not listed
  text "galvanic    isolation" at 1164.35,3793.75 h40
  text "↯" at 2081.25,3293.75 h1200
  text "Passive Cell / Balancing" at 5770,3216.25 h60 r90
  text "DANGER / high voltage / >60VDC" at 1968.75,3125 h60
  text "foxBMS.org" at 143.75,2900 h120 r90
  text "Fraunhofer IISB / foxBMS Slave 12-Cell v'.GlobalVersion'" at 5950,2862.5 h50 r90
  text "isolating / DC/DC Converter" at 921.25,2750 h60
  text "Analog / Multiplexers" at 231.25,2693.75 h60
  text "VREF2_1" at 3669.08,2585 h50
  text "VREF1_1" at 3669.08,2533.33 h50
  text "Primary LTC6811" at 5151.25,2517.5 h60
  text "Secondary LTC6811" at 3086.71,2514.45 h60
  text "SDA_1" at 3669.03,2481.67 h50
  text "VREG_0" at 5553.97,2456.46 h50
  text "VBAT-" at 5212.5,2450 h50
  text "VREG_1" at 3450,2449.45 h50
  text "VBAT-" at 3109.84,2447.93 h50
  text "SCL_1" at 3669.03,2430 h50
  text "VREF2_0" at 5928.97,2381.46 h50
  text "VREF1_0" at 5928.97,2268.96 h50
  text "SDA_0" at 5928.92,2156.46 h50
  text "SECONDARY" at 1406.09,2118.75 h50
  text "SCL_0" at 5928.92,2050 h50
  text "Extension / Pin Headers" at 142.5,1522.01 h60 r90
  text "PRIMARY" at 1488.88,1501.91 h50
  text "isoSPI / Transformers" at 1358.75,1216.25 h60
  text "DC-" at 251.09,1131.25 h40 r90
  text "DC-" at 313.59,1131.25 h40 r90
  text "IN-" at 798.79,1131.25 h40 r90
  text "OUT-" at 736.29,1118.75 h40 r90
  text "Input Filter/Protection" at 6240,1100 h60 r90
  text "DC+" at 251.09,1006.25 h40 r90
  text "DC+" at 313.59,1006.25 h40 r90
  text "IN+" at 798.79,1006.25 h40 r90
  text "OUT+" at 736.29,981.25 h40 r90
  text "C_0-" at 5904.76,952.85 h50 r90
  text "C_9+" at 5154.76,942.88 h50 r90
  text "C_8+" at 5229.76,942.88 h50 r90
  text "C_7+" at 5304.76,942.88 h50 r90
  text "C_6+" at 5379.76,942.88 h50 r90
  text "C_5+" at 5454.76,942.88 h50 r90
  text "C_4+" at 5529.76,942.88 h50 r90
  text "C_3+" at 5604.76,942.88 h50 r90
  text "C_2+" at 5679.76,942.88 h50 r90
  text "C_1+" at 5754.76,942.88 h50 r90
  text "C_0+" at 5829.76,942.88 h50 r90
  text "C_11+" at 5004.76,918.02 h50 r90
  text "C_10+" at 5079.76,918.02 h50 r90
  text "VBAT-" at 6035,916.08 h50 r90
  text "VBAT+" at 4885,906.1 h50 r90
  text "Creative Commons / Attribution 4.0" at 150,762.5 h50 r90
  text "Fuses / 0.25 A" at 5015.06,718.77 h40 r90
  text "Fuses / 0.5 A" at 4793.75,642.76 h40 r90
  text "Input Fuses" at 6241.25,525.14 h60 r90
  text "Cell Voltages" at 4653.55,520.88 h60 r90
  text "Temp. Sensors" at 4401.58,506.25 h60 r90
  text "Fuse / 1.25 A" at 354.7,487.01 h50 r90
Bottom Overlay:
  lines w8: 30,1497.01 167.5,1497.01 167.5,1847.01 30,1847.01 30,1497.01 ; 443.75,477.22 443.75,927.22 543.75,927.22 543.75,477.22 443.75,477.22 ; 762.5,477.22 862.5,477.22 862.5,864.72 762.5,864.72 762.5,477.22 ; 1018.75,477.22 1118.75,477.22 1118.75,1102.22 1018.75,1102.22 1018.75,477.22 ; 1318.75,477.22 1418.75,477.22 1418.75,1052.22 1318.75,1052.22 1318.75,477.22 ; 1618.75,477.22 1718.75,477.22 1718.75,1027.22 1618.75,1027.22 1618.75,477.22 ; 1906.25,477.22 2006.25,477.22 2006.25,964.72 1906.25,964.72 1906.25,477.22 ; 2368.75,477.22 2368.75,639.72 2968.75,639.72 2968.75,477.22 2368.75,477.22 ; 3493.75,477.22 3493.75,639.72 4093.75,639.72 4093.75,477.22 3493.75,477.22 ; 4981.25,477.22 5306.25,477.22 5306.25,639.72 4981.25,639.72 4981.25,477.22
  text "Extension / Pin Headers" at 55,1521.52 h60 r270
  text "Temperature Sensors / Secondary" at 2943.75,503.39 h60
  text "Temperature Sensors / Primary" at 4068.75,503.39 h60
  text "DC Supply OUT" at 481.25,502.22 h60 r270
  text "DC Supply IN" at 800,502.22 h60 r270
  text "isoSPI OUT Secondary" at 1056.25,502.22 h60 r270
  text "isoSPI IN Secondary" at 1356.25,502.22 h60 r270
  text "isoSPI OUT Primary" at 1656.25,502.22 h60 r270
  text "isoSPI IN Primary" at 1943.75,502.22 h60 r270
  text "Cell Sense / Inputs" at 5281.25,502.22 h60
Top Solder:
Dimension:
  the board outline again, w6

## Text inside footprints (layer, text, board x,y; h text height)
Designator28: Top Copper "1" at 2043.75,3874.5 h40; FUSED_VBAT- "2" at 2091.75,3874.5 h40; Signal Layer 2 "3" at 2141.75,3874.5 h40; Signal Layer 3 "4" at 2209.25,3874.5 h40; VREG "5" at 2258.25,3874.5 h40; Bot Copper "6" at 2308.25,3874.5 h40